# Altium PCB ChrisByrd-IoT_Product.PcbDoc (part 1 of 6)
Units mil, origin at the board's own origin, x right, y up, seen from the top; angles counter-clockwise.
Board outline 5314.96 x 4000 mil, 2 copper layers (Top Layer, Bottom Layer), stack 57 mil thick; 306 components, 230 nets, 1006 pads, 531 vias.
Unrouted connection lines stored in the file: 476.
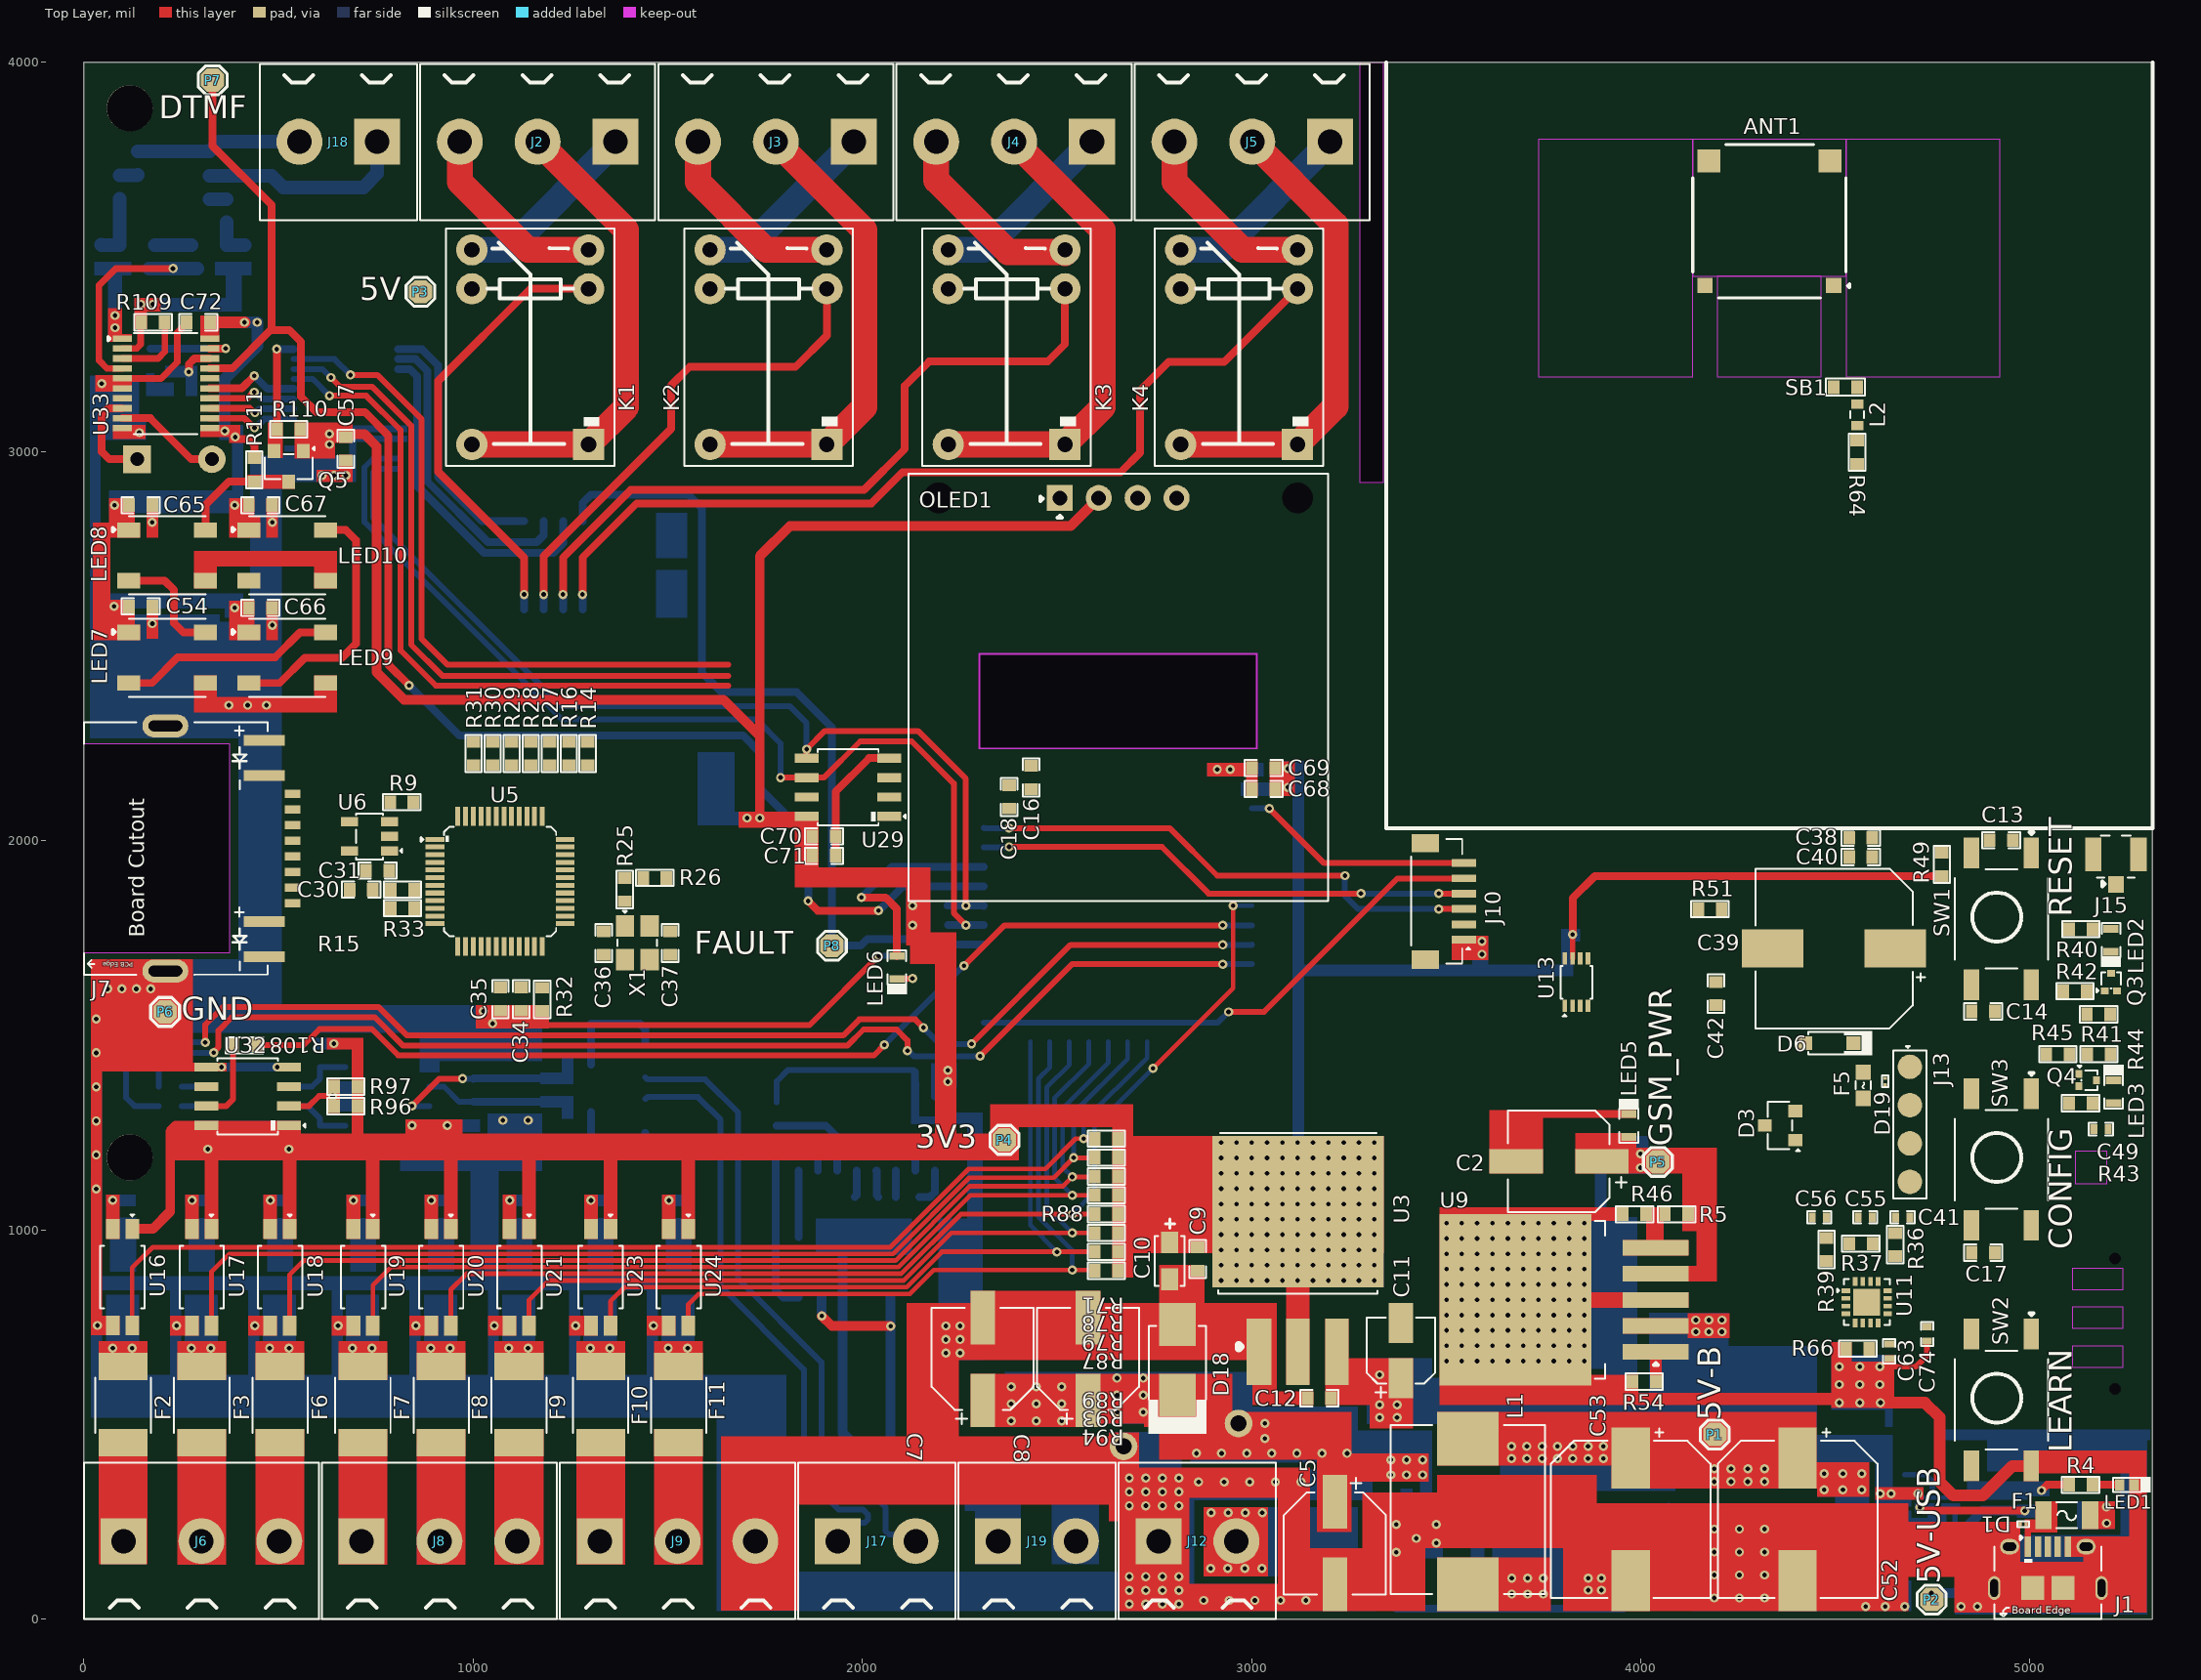
[diagram p0: Top Layer view]
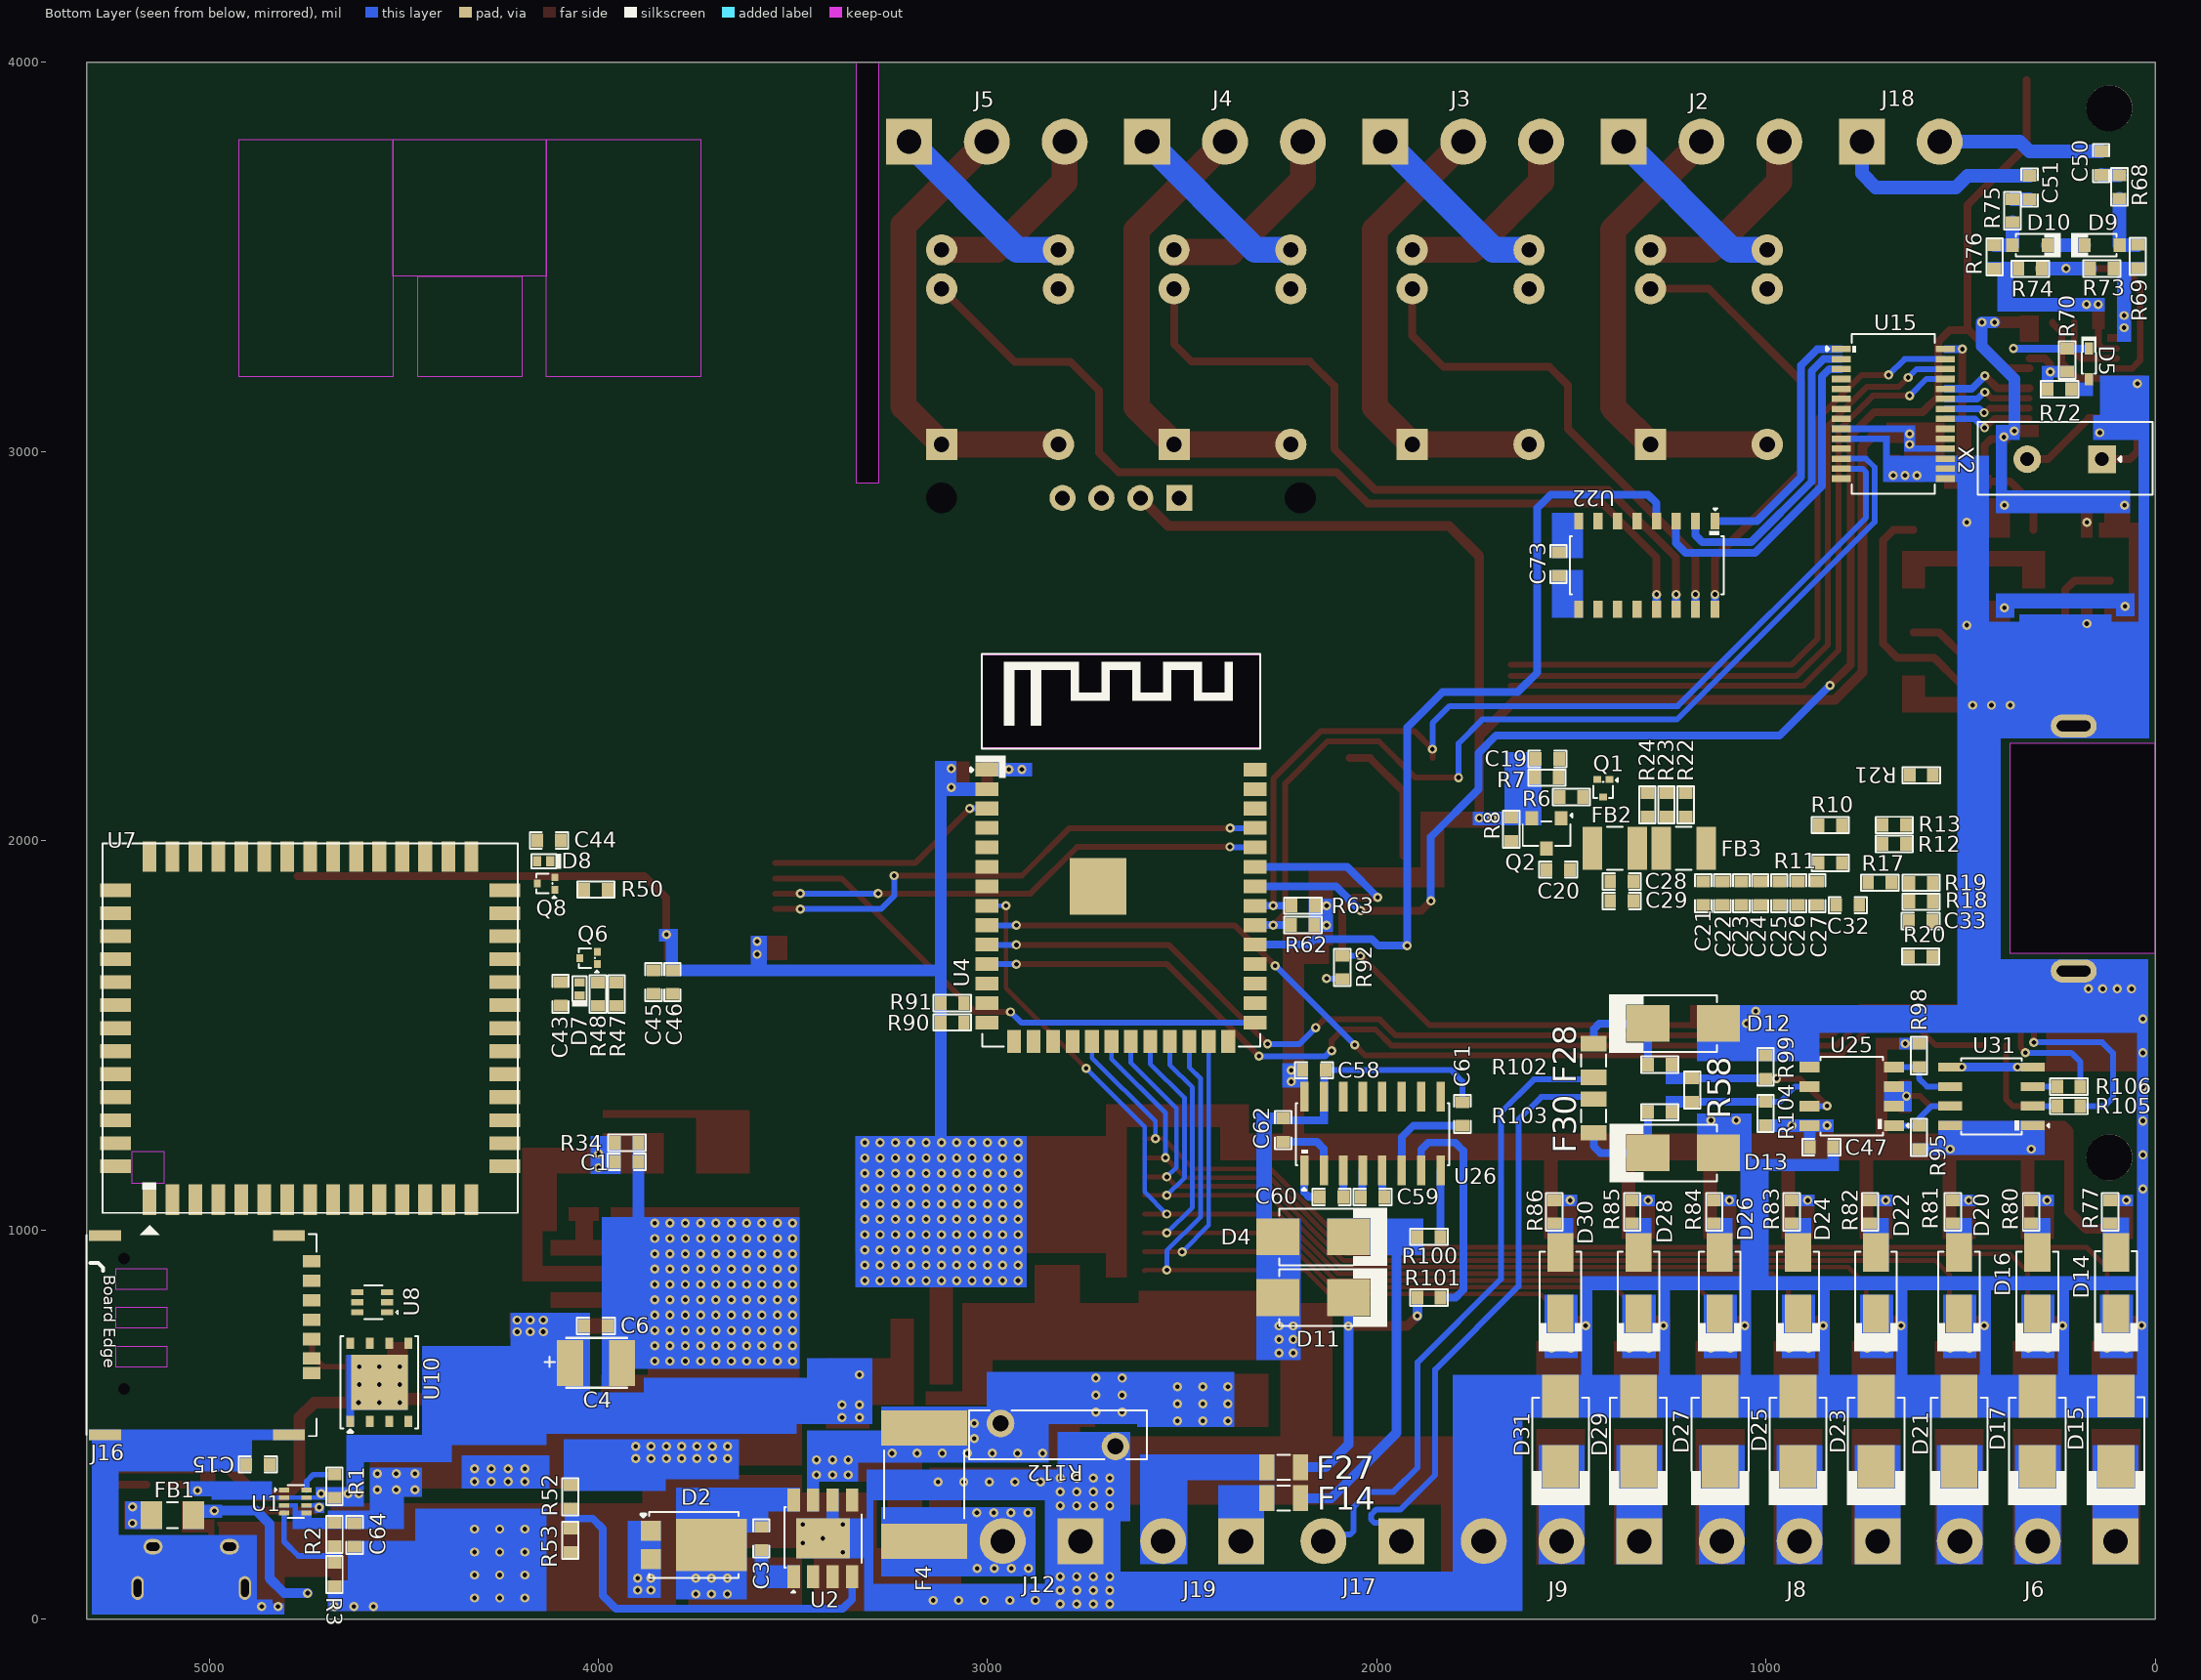
[diagram p1: Bottom Layer view, seen from below]

## Layer stack, top to bottom
Top Solder: solder mask 3, Solder Resist, Dk 3.5
Top Layer: signal copper 10
Dielectric 1: dielectric 37, FR-4, Dk 4.8
Bottom Layer: signal copper 10
Bottom Solder: solder mask 3, Solder Resist, Dk 3.5

## Board outline
0,0 5314.96,0 5314.96,4000 0,4000
cut-out: 2299.09,2236.31 3015.09,2236.31 3015.09,2480.01 2299.09,2480.01
cut-out: 0,1711 0,2249.05 374.01,2248.99 374.01,1711
cut-out: 3279.53,2919.85 3279.53,4000 3338.58,4000 3338.58,2919.85

## Design rules (kind name [scope] priority, off if disabled: settings)
Clearance [All] p1: gap=5 ignorepadtopadclearanceinfootprint=TRUE
ComponentClearance [All] p1: gap=0 collisioncheckmode=3 verticalgap=0 showdistances=FALSE
DiffPairsRouting DiffPairsRouting_USB [InDifferentialPairClass('GSM_USB_Lines')] p1: maxlimit=14 minlimit=14 mostfreqgap=14 toplayer_minwidth=15 toplayer_maxwidth=15 toplayer_prefwidth=15 bottomlayer_minwidth=15 bottomlayer_maxwidth=15 bottomlayer_prefwidth=15 impedanceprofiledriven=TRUE impedanceprofileid={E67A9529-945D-4E26-B9DB-1DDE1D698E6C} impedanceprofilevalue=90.000000 maxuncoupledlength=500
DiffPairsRouting DiffPairsRouting_RS485 [InDifferentialPairClass('RS485_LINES')] p2: maxlimit=30 minlimit=30 mostfreqgap=30 toplayer_minwidth=15 toplayer_maxwidth=15 toplayer_prefwidth=15 bottomlayer_minwidth=15 bottomlayer_maxwidth=15 bottomlayer_prefwidth=15 impedanceprofiledriven=TRUE impedanceprofileid={DA487A43-3C18-4068-BCE5-7E4DBD23F805} impedanceprofilevalue=120.000000 maxuncoupledlength=500
DiffPairsRouting DiffPairsRouting_Ethernet [InDifferentialPairClass('EtherCAT_A_Lines')] p3: maxlimit=20 minlimit=20 mostfreqgap=20 toplayer_minwidth=18 toplayer_maxwidth=18 toplayer_prefwidth=18 bottomlayer_minwidth=18 bottomlayer_maxwidth=18 bottomlayer_prefwidth=18 impedanceprofiledriven=TRUE impedanceprofileid={7F682D63-5A6A-4BE7-88C5-E323DC3F47E4} impedanceprofilevalue=100.000000 maxuncoupledlength=500
HoleToHoleClearance [All] p1: gap=5 allowstackedmicrovias=TRUE
MatchedLengths "Schematic Matched Net Lengths" [InDifferentialPairClass('EtherCAT_A_Lines')] p1: tolerance=20 checknetsindiffpair=TRUE checkdiffpairvsdiffpair=FALSE checkxsignals=FALSE checkothers=FALSE
MatchedLengths "Schematic Matched Net Lengths_2" [InDifferentialPairClass('GSM_USB_Lines')] p2: tolerance=20 checknetsindiffpair=TRUE checkdiffpairvsdiffpair=FALSE checkxsignals=FALSE checkothers=FALSE
MatchedLengths "Schematic Matched Net Lengths_1" [InDifferentialPairClass('RS485_LINES')] p3: tolerance=20 checknetsindiffpair=TRUE checkdiffpairvsdiffpair=FALSE checkxsignals=FALSE checkothers=FALSE
MaxMinImpedance "Schematic Impedance Constraint_1" [InNetClass('RS485')] p1: minimum=115.0 maximum=120.0
MaxMinImpedance "Schematic Impedance Constraint_2" [InNetClass('EtherCAT_A')] p2: minimum=85.00 maximum=95.00
MaxMinImpedance "Schematic Impedance Constraint" [InNetClass('GSM_USB')] p3: minimum=85.00 maximum=90.00
MinimumSolderMaskSliver [All] p1: minsoldermaskwidth=0
PolygonConnect [All] p1: connectstyle=Relief reliefconductorwidth=20 reliefentries=4 polygonreliefangle="45 Angle" airgapwidth=10
RoutingVias [All] p1: holewidth=11.81 width=23.62 viastyle="Through Hole" minholewidth=11.81 minwidth=23.62 maxholewidth=11.81 maxwidth=23.62
SilkToSilkClearance [All] p1: silktosilkclearance=6
SilkToSolderMaskClearance [IsPad] p1: minsilkscreentomaskgap=3 clearancetoexposedcopper=TRUE
SolderMaskExpansion [All] p1: expansion=4 istentingtop=FALSE
UnRoutedNet [All] p1: checkbadconnections=TRUE
Width [All] p1: maxlimit=66.93 minlimit=10 preferedwidth=20 minimp=50.000000 maximp=50.000000 favimp=50.000000
23 further rules are at their usual default settings.

## Classes and differential pairs
differential pair class RS485_LINES: RS485
net class RS485: RS485_N RS485_P
differential pair class GSM_USB_Lines: GSM_PROG.GSM_USB_D
differential pair class EtherCAT_A_Lines: RD TD
net class GSM_USB: GSM_PROG.GSM_USB_D_N GSM_PROG.GSM_USB_D_P
net class EtherCAT_A: RD_N RD_P TD_N TD_P
component class U_RS485_RS232_Sheet: C47 C58 C59 C60 C61 C62 D4 D11 D12 D13 F14 F27 F28 F30 R58 R95 R96 R97 R98 R99 R100 R101 R102 R103 R104 R105 R106 R108 U25 U26 U31 U32
component class U_Power_Sheet: C1 C2 C3 C4 C5 C6 C7 C8 C9 C10 C11 C12 C52 C53 C64 D2 L1 LED1 LED5 P1 P2 P3 P4 P5 P6 R1 R2 R3 R4 R5 R34 R46 R52 R53 R54 U1 U2 U3 U9
component class U_LEDs_Sheet: C54 C65 C66 C67 LED7 LED8 LED9 LED10 Q5 R110 R111
component class U_GSM_Sheet: ANT1 C38 C39 C40 C41 C42 C43 C44 C45 C46 C49 C55 C56 C63 C74 D6 D7 D8 J15 J16 L2 LED2 LED3 Q3 Q4 Q6 Q8 R36 R37 R39 R40 R41 R42 R43 R44 R45 R47 R48 R50 R51 R64 R66 SB1 U7 U8 U10 U11 U13
component class U_GPIOs_Expander_Relay_Sheet: C57 C73 D14 D15 D16 D17 D20 D21 D22 D23 D24 D25 D26 D27 D28 D29 D30 D31 F2 F3 F6 F7 F8 F9 F10 F11 K1 K2 K3 K4 R77 R80 R81 R82 R83 R84 R85 R86 U15 U16 U17 U18 U19 U20 U21 U22 U23 U24
component class U_Ethernet_Sheet: C19 C20 C21 C22 C23 C24 C25 C26 C27 C28 C29 C30 C31 C32 C33 C34 C35 C36 C37 FB2 FB3 J7 Q1 Q2 R6 R7 R8 R9 R10 R11 R12 R13 R14 R15 R16 R17 R18 R19 R20 R21 R22 R23 R24 R25 R26 R27 R28 R29 R30 R31 R32 R33 U5 U6 X1
component class U_DTMF_Decoder_Sheet: C50 C51 C72 D5 D9 D10 R68 R69 R70 R72 R73 R74 R75 R76 R109 U33 X2
component class U_Controller_Sheet: C13 C14 C15 C16 C17 C18 C68 C69 C70 C71 J10 LED6 OLED1 P7 P8 R49 R62 R63 R71 R78 R79 R87 R88 R89 R90 R91 R92 R93 R94 SW1 SW2 SW3 U4 U29
component class U_Connector_Sheet: D1 D3 D18 D19 F1 F4 F5 FB1 J1 J2 J3 J4 J5 J6 J8 J9 J12 J13 J17 J18 J19 R112
differential pair RS485: +RS485_P -RS485_N
differential pair TD: +TD_P -TD_N
differential pair RD: +RD_P -RD_N
differential pair GSM_PROG.GSM_USB_D: +GSM_PROG.GSM_USB_D_P -GSM_PROG.GSM_USB_D_N

## Components (designator, comment, footprint, x,y, rotation, side; value= is the part's Value field where it differs from the comment)
ANT1 "2118900-1" 2118900-1 4330.32,3586.61 r0 top
C1 "0.1uF" Cap-0603 3926.74,1174.47 r0 bottom
C2 "330uF" GVT1C331M0607 3790,1176 r180 top
C3 "10nF" Cap-0603 3581.26,206.55 r270 bottom
C4 "100uF" Case-B 4006,658 r180 bottom
C5 "68uF" RVT1H680M0607 3214,195 r270 top locked
C6 "1uF" Cap-0603 4006.07,753.11 r180 bottom
C7 "68uF" RVT1H680M0607 2309.1,668 r90 top
C8 "68uF" RVT1H680M0607 2580,668 r90 top
C9 "0.1uF" Cap-0603 2861.5,924.72 r90 top
C10 "47uF" Case-A 2789.49,920.35 r270 top
C11 "10uF" RVT1E100M0405_ 3383.55,689.89 r90 top
C12 "0.1uF" Cap-0603 3174.48,567.01 r0 top
C13 "0.1uF" Cap-0603 4926.38,2000.97 r180 top
C14 "1uF" Cap-0603 4880.16,1560.91 r0 top
C15 "0.1uF" Cap-0603 4875,396.97 r180 bottom
C16 "1uF" Cap-0603 2434,2162.61 r90 top
C17 "0.1uF" Cap-0603 4880.16,941.09 r180 top
C18 "1uF" Cap-0603 2377.24,2112.61 r90 top
C19 "22uF" Cap-0603 1562.07,2209.78 r0 bottom
C20 "22uF" Cap-0603 1534.03,1925.57 r0 bottom
C21 "0.1uF" Cap-0603 1161.26,1865 r90 bottom
C22 "0.1uF" Cap-0603 1112.45,1865 r90 bottom
C23 "0.1uF" Cap-0603 1063.65,1865 r90 bottom
C24 "0.1uF" Cap-0603 1014.84,1865 r90 bottom
C25 "0.1uF" Cap-0603 966.04,1865 r90 bottom
C26 "0.1uF" Cap-0603 917.23,1865 r90 bottom
C27 "10uF" Cap-0603 868.43,1865 r90 bottom
C28 "10uF" Cap-0603 1370.43,1895 r180 bottom
C29 "0.1uF" Cap-0603 1370.43,1845 r180 bottom
C30 "6.8nF" Cap-0603 712.72,1874 r0 top
C31 "6.8nF" Cap-0603 755,1923 r180 top
C32 "22nF" Cap-0603 790.42,1834.25 r180 bottom
C33 "10nF" Cap-0603 602.9,1793.54 r180 bottom
C34 "10nF" Cap-0603 1123.43,1593 r90 top
C35 "4.7uF" Cap-0603 1070.43,1593 r90 top
C36 "12pF" Cap-0603 1335.57,1737.13 r90 top
C37 "12pF" Cap-0603 1506.56,1737.13 r270 top
C38 "0.1uF" Cap-0603 4565.32,2007.24 r0 top
C39 "220uF" UCD-220uF-10mmDia 4496.32,1722.69 r180 top
C40 "1uF" Cap-0603 4565.32,1957.69 r180 top
C41 "22PF" Cap-0402 4672.71,1031.91 r180 top value=22pF
C42 "0.1uF" Cap-0603 4193,1607 r270 top
C43 "0.1uF" Cap-0603 4097,1606 r90 bottom
C44 "0.1uF" Cap-0603 4127,2000.58 r0 bottom
C45 "0.1uF" Cap-0603 3858.3,1636.23 r90 bottom
C46 "0.1uF" Cap-0603 3809.68,1636.24 r90 bottom
C47 "0.1uF" Cap-0603 858,1212 r0 bottom
C49 "33pF" Cap-0402 5182.3,1258.58 r180 top
C50 "0.1uF" Cap-0603 139,3741 r90 bottom
C51 "0.1uF" Cap-0603 323,3678.61 r90 bottom
C52 "220uF" UCD-220uF-10mmDia 4403,256 r270 top locked
C53 "220uF" UCD-220uF-10mmDia 3974,256 r270 top locked
C54 "0.1uF" Cap-0603 146.04,2601.82 r0 top
C55 "22PF" Cap-0402 4576.66,1031.91 r0 top value=22pF
C56 "22PF" Cap-0402 4458.8,1031.91 r0 top value=22pF
C57 "0.1uF" Cap-0603 673.32,3007.12 r270 top
C58 "0.1uF" Cap-0603 2161,1410 r0 bottom
C59 "0.1uF" Cap-0603 2011.06,1084.51 r180 bottom
C60 "0.1uF" Cap-0603 2116.06,1084.5 r180 bottom
C61 "0.1uF" Cap-0603 1780,1298 r90 bottom
C62 "0.1uF" Cap-0603 2240.81,1255.99 r90 bottom
C63 "100nF" cap-0402 4638.21,687.81 r90 top
C64 "0.1uF" Cap-0603 4625.96,215.94 r270 bottom
C65 "0.1uF" Cap-0603 145.86,2862.12 r0 top
C66 "0.1uF" Cap-0603 454.13,2598 r0 top
C67 "0.1uF" Cap-0603 454.13,2862.12 r0 top
C68 "0.1uF" Cap-0603 3031.01,2132.6 r180 top
C69 "0.1uF" Cap-0603 3031.01,2186.77 r180 top
C70 "0.1uF" Cap-0603 1902,2011 r0 top
C71 "10uF" Cap-0603 1902,1961 r0 top
C72 "0.1uF" Cap-0603 294.23,3331.92 r180 top
C73 "0.1uF" Cap-0603 1533.32,2710.69 r90 bottom
C74 "100nF" cap-0402 4735.66,732.49 r90 top
D1 "PESD5V0H1BSFYL" DSN0603-2 4982.17,243.49 r180 top
D2 "ST20100L" TO-277 3787,190 r270 bottom
D3 "ESD5302F-3/TR" Sot-23 4358,1268 r90 top
D4 "SMBJ26CA" SMB_ 2163.43,981.77 r180 bottom
D5 "1N4148WT" SOD-523F 170.63,3225.12 r90 bottom
D6 "MMSZ5231BT1G" SOD-123 4484.35,1479.41 r0 top
D7 "ESD5651N-2/TR" DFN1006-2L_ 4048,1619 r90 bottom
D8 "ESD5651N-2/TR" DFN1006-2L_ 4140.27,1946.99 r0 bottom
D9 "BZT52C5V6S" SOD-323 136.94,3530 r180 bottom
D10 "BZT52C5V6S" SOD-323 321.72,3530 r0 bottom
D11 "SMBJ26CA" SMB_ 2163.43,825.71 r180 bottom
D12 "SMBJ26CA" SMB_ 1213,1530 r0 bottom
D13 "SMBJ26CA" SMB_ 1212.69,1197.56 r0 bottom
D14 "SS36" SMA 101,863.3 r90 bottom
D15 "SMBJ36CA" SMB_ 101,482.3 r270 bottom
D16 "SS36" SMA 303,863 r90 bottom
D17 "SMBJ36CA" SMB_ 303,482 r270 bottom
D18 "SMBJ36CA" SMB_ 2809.5,666.03 r270 top
D19 "PESD5V0H1BSFYL" DSN0603-2 4627.94,1381.17 r270 top
D20 "SS36" SMA 504,863 r90 bottom
D21 "SMBJ36CA" SMB_ 504,481.97 r270 bottom
D22 "SS36" SMA 717.68,863.01 r90 bottom
D23 "SMBJ36CA" SMB_ 717,481.97 r270 bottom
D24 "SS36" SMA 918,863.01 r90 bottom
D25 "SMBJ36CA" SMB_ 918,481.97 r270 bottom
D26 "SS36" SMA 1119,863 r90 bottom
D27 "SMBJ36CA" SMB_ 1118,481.97 r270 bottom
D28 "SS36" SMA 1328,863 r90 bottom
D29 "SMBJ36CA" SMB_ 1328,481.97 r270 bottom
D30 "SS36" SMA 1528,863 r90 bottom
D31 "SMBJ36CA" SMB_ 1528,481.97 r270 bottom
F1 "1206L300SLTHYR" "Fuse 1206 (3216 Metric)" 5094.36,266.95 r0 top
F2 "BSMD1812-150-33V" Fuse-1812_ 101,551.3 r270 top
F3 "BSMD1812-150-33V" Fuse-1812_ 303,551 r270 top
F4 "SHV2920P500-30-AA" Fuse-2920 3163,345 r90 bottom locked
F5 "SMD0603-050" Fuse-0603 4571.66,1371.35 r270 top
F6 "BSMD1812-150-33V" Fuse-1812_ 504,551 r270 top
F7 "BSMD1812-150-33V" Fuse-1812_ 717,551 r270 top
F8 "BSMD1812-150-33V" Fuse-1812_ 918,551 r270 top
F9 "BSMD1812-150-33V" Fuse-1812_ 1118,551 r270 top
F10 "BSMD1812-150-33V" Fuse-1812_ 1328,551 r270 top
F11 "BSMD1812-150-33V" Fuse-1812_ 1528,551 r270 top
F14 "SMD0805P020TF" Fuse-0805 2239.28,310.27 r180 bottom
F27 "SMD0805P020TF" Fuse-0805 2239.28,389.82 r180 bottom
F28 "SMD0805P020TF" Fuse-0805 1443,1435 r270 bottom
F30 "SMD0805P020TF" Fuse-0805 1443,1292.65 r90 bottom
FB1 "100MHz" IND-1206 5094.36,266.95 r180 bottom
FB2 "FBMH3225HM601NT" IND-1210 1388.51,1980 r180 bottom
FB3 "FBMH3225HM601NT" IND-1210 1211.51,1980 r180 bottom
J1 "10118194-0001LF" 10118194-0001LF_ 5045.9,185.81 r0 top locked
J2 "DB128L-5.08-3P-BK-S" DB128L-5.08-3P-BK-S 1166,3796 r180 top locked
J3 "DB128L-5.08-3P-BK-S" DB128L-5.08-3P-BK-S 1778,3796 r180 top locked
J4 "DB128L-5.08-3P-BK-S" DB128L-5.08-3P-BK-S 2390,3796 r180 top locked
J5 "DB128L-5.08-3P-BK-S" DB128L-5.08-3P-BK-S 3002,3796 r180 top locked
J6 "DB128L-5.08-3P-BK-S" DB128L-5.08-3P-BK-S 302,200 r0 top locked
J7 "RC01812" RC01812 373,1980 r90 top locked
J8 "DB128L-5.08-3P-BK-S" DB128L-5.08-3P-BK-S 913.67,200 r0 top locked
J9 "DB128L-5.08-3P-BK-S" DB128L-5.08-3P-BK-S 1525.33,200 r0 top locked
J10 "Voltlink Target" "Voltlink Target" 3496,1844 r90 top
J12 "DB128L-5.08-2P-BK-S" DB128L-5.08-2P-BK-S 2861,200 r0 top locked
J13 "POGO Connector 4 Pin" "Pogo 4 Pin" 4691.3,1271.12 r270 top
J15 "U.FL-R-SMT-1(80)" U.FL-R-SMT-1(80)_ 5220.56,1925.9 r0 top
J16 "XKNANO-113" XKNANO-113 5002,729 r270 bottom
J17 "DB128L-5.08-2P-BK-S" DB128L-5.08-2P-BK-S 2037.28,200 r0 top locked
J18 "DB128L-5.08-2P-BK-S" DB128L-5.08-2P-BK-S 654,3796 r180 top locked
J19 "DB128L-5.08-2P-BK-S" DB128L-5.08-2P-BK-S 2449,200 r0 top locked
K1 "BS4-5S-C20" BS4-5S-C20 1147,3268 r90 top
K2 "BS4-5S-C20" BS4-5S-C20 1759,3268 r90 top
K3 "BS4-5S-C20" BS4-5S-C20 2371,3268 r90 top
K4 "BS4-5S-C20" BS4-5S-C20 2968,3268 r90 top
L1 "10uH" PSPMAA1040-100M-ANP 3556,276 r90 top
L2 "27nH" "IND-0603 (1608 Metric)" 4556,3094.44 r90 top
LED1 "Green" LED-0402 5248.83,344.69 r0 top
LED2 "Yellow" LED-0603 5208.13,1744.11 r270 top
LED3 "RED" LED-0603 5214.48,1354.99 r90 top
LED5 "RED" LED-0603 3969.13,1268 r90 top
LED6 "Blue" LED-0603 2089,1674 r270 top
LED7 "WS2812B-B/W" WS2812B-B/W 214.29,2470 r0 top
LED8 "WS2812B-B/W" WS2812B-B/W 214.29,2733.12 r0 top
LED9 "WS2812B-B/W" WS2812B-B/W 522.65,2470 r0 top
LED10 "WS2812B-B/W" WS2812B-B/W 522.65,2733.12 r0 top
OLED1 "OLED 0.96\" inch i2C" "OLED 0.96\" INCH I2C" 2657.48,2880.47 r0 top locked
P1 "TEST POINT" Test-point 4190.36,474.09 r0 top
P2 "TEST POINT" Test-point 4747.37,49.82 r0 top
P3 "TEST POINT" Test-point 865,3410.17 r0 top
P4 "TEST POINT" Test-point 2365,1231 r0 top
P5 "TEST POINT" Test-point 4044,1174.47 r0 top
P6 "TEST POINT" Test-point 209,1560 r270 top
P7 "TEST POINT" Test-point 330.82,3954.02 r0 top
P8 "TEST POINT" Test-point 1922,1730 r0 top
Q1 "MMBT3904M" SOT-723 1418.32,2134.62 r0 bottom
Q2 "FDN306P" SOT-23 1564.03,2018.63 r0 bottom
Q3 "MMBT3904M" SOT-723 5208.13,1635.96 r0 top
Q4 "MMBT3904M" SOT-723 5148.33,1384.48 r270 top
Q5 "BSS138" Sot-23 526.46,2961.41 r180 top
Q6 "MMBT3904M" SOT-723 4024.68,1698.31 r90 bottom
Q8 "MMBT3904M" SOT-723 4134.48,1889.75 r90 bottom
R1 "10K" Res-0603 4677.9,341 r270 bottom
R2 "1K" Res-0603 4677.9,216.94 r90 bottom
R3 "1K" Res-0603 4677.9,114 r90 bottom
R4 "1K" Res-0603 5130.26,344.7 r0 top
R5 "100K" Res-0603 4092.02,1040 r180 top
R6 "1K" Res-0603 1500.32,2111.98 r180 bottom
R7 "10K" Res-0603 1563.07,2161.78 r0 bottom
R8 "0R" Res-0603 1654.43,2029 r90 bottom
R9 "49.9R" Res-0603 816.88,2098.56 r0 top
R10 "49.9R" Res-0603 834.88,2039.66 r0 bottom
R11 "10R" Res-0603 834.88,1942.42 r0 bottom
R12 "33R" Res-0603 670.9,1991.67 r180 bottom
R13 "33R" Res-0603 670.9,2040.23 r180 bottom
R14 "10K" Res-0603 1294.43,2224 r90 top
R15 "33R" Res-0603 819,1874 r0 top
R16 "10K" Res-0603 1246.09,2224 r90 top
R17 "33R" Res-0603 707.8,1892.13 r0 bottom
R18 "49.9R" Res-0603 601.9,1843.02 r0 bottom
R19 "49.9R" Res-0603 601.9,1891.51 r0 bottom
R20 "330R" Res-0603 602.9,1702.05 r0 bottom
R21 "330R" Res-0603 601,2168 r0 bottom
R22 "10K" Res-0603 1206.42,2092 r270 bottom
R23 "10K" Res-0603 1255.99,2092 r270 bottom
R24 "10K" Res-0603 1304.74,2092 r270 bottom
R25 "1M" Res-0603 1389.9,1874.13 r90 top
R26 "0R" Res-0603 1466.9,1904.13 r180 top
R27 "10K" Res-0603 1197.16,2224 r270 top
R28 "10K" Res-0603 1148.19,2224 r270 top
R29 "10K" Res-0603 1099.22,2224 r270 top
R30 "10K" Res-0603 1050.25,2224 r270 top
R31 "10K" Res-0603 1001.28,2224 r270 top
R32 "10K" Res-0603 1177.69,1592 r90 top
R33 "12.4K" Res-0603 819,1826.3 r0 top
R34 "470R" Res-0603 3926.74,1223.44 r0 bottom
R36 "22R" Res-0603 4654.02,961.91 r90 top
R37 "0R" Res-0603 4565.5,964.41 r180 top
R39 "22R" Res-0603 4477.24,949.41 r90 top
R40 "180R" Res-0603 5130.81,1772.36 r0 top
R41 "4.7K" Res-0603 5176.32,1553.35 r180 top
R42 "47K" Res-0603 5115.81,1612.91 r0 top
R43 "180R" Res-0603 5130.26,1325.45 r0 top
R44 "4.7K" Res-0603 5177.15,1451.06 r180 top
R45 "47K" Res-0603 5071.64,1451.12 r0 top
R46 "47K" Res-0603 3983.99,1040 r0 top
R47 "4.7K" Res-0603 3953.24,1605.57 r90 bottom
R48 "47K" Res-0603 4001.06,1605.57 r90 bottom
R49 "10K" Res-0603 4773.32,1938.69 r270 top
R50 "4.7K" Res-0603 4006,1874 r0 bottom
R51 "47K" Res-0603 4177.6,1823.76 r180 top
R52 "10K" Res-0603 4072,314 r90 bottom
R53 "3.24K" Res-0603 4072,201.8 r90 bottom
R54 "10K" Res-0603 4009,609.96 r0 top
R58 "120R" Res-0603 1189.89,1359.09 r270 bottom
R62 "4.7K" Res-0603 2190,1783 r180 bottom
R63 "4.7K" Res-0603 2189.49,1832.99 r180 bottom
R64 "10R" Res-0603 4556,2998 r270 top
R66 "10K" Res-0603 4557.66,694.46 r180 top
R68 "56K" Res-0603 92,3680 r270 bottom
R69 "56K" Res-0603 44.98,3500.99 r270 bottom
R70 "330K" Res-0603 226.23,3234.52 r90 bottom value=330kR
R71 "10K" Res-0603 2627,1234 r180 top
R72 "100K" Res-0603 246.08,3159.82 r180 bottom
R73 "47K" Res-0603 137.41,3470 r0 bottom
R74 "68K" Res-0603 321.25,3469.49 r180 bottom
R75 "56K" Res-0603 367,3618.61 r270 bottom
R76 "56K" Res-0603 413,3500 r270 bottom
R77 "2.2K" Res-0603 115.94,1046 r270 bottom
R78 "10K" Res-0603 2627.01,1185.57 r180 top
R79 "10K" Res-0603 2627.01,1137.14 r180 top
R80 "2.2K" Res-0603 319,1046 r270 bottom
R81 "2.2K" Res-0603 520,1046 r270 bottom
R82 "2.2K" Res-0603 733,1046 r270 bottom
R83 "2.2K" Res-0603 934,1046 r270 bottom
R84 "2.2K" Res-0603 1133.14,1046 r270 bottom
R85 "2.2K" Res-0603 1344,1046 r270 bottom
R86 "2.2K" Res-0603 1544,1046 r270 bottom
R87 "10K" Res-0603 2627.01,1088.71 r180 top
R88 "10K" Res-0603 2627.02,1040.29 r180 top
R89 "10K" Res-0603 2627,991.86 r180 top
R90 "4.7K" Res-0603 3090.62,1532.61 r0 bottom
R91 "4.7K" Res-0603 3090.62,1582.61 r0 bottom
R92 "1K" Res-0603 2089,1674 r270 bottom
R93 "10K" Res-0603 2627,943.43 r180 top
R94 "10K" Res-0603 2627,895 r180 top
R95 "4.7K" Res-0603 607.19,1237.25 r90 bottom
R96 "4.7K" Res-0603 673.12,1317.89 r180 top
R97 "4.7K" Res-0603 673.12,1367.89 r180 top
R98 "4.7K" Res-0603 607.19,1447.87 r270 bottom
R99 "4.7K" Res-0603 1001.28,1418.51 r270 bottom
R100 "22R" Res-0603 1866,981.77 r180 bottom
R101 "22R" Res-0603 1866,825.71 r180 bottom
R102 "22R" Res-0603 1273.09,1424.63 r0 bottom
R103 "22R" Res-0603 1273.09,1302.24 r0 bottom
R104 "4.7K" Res-0603 1001.28,1299.15 r270 bottom
R105 "1K" Res-0603 222,1318 r180 bottom
R106 "1K" Res-0603 222,1368 r180 bottom
R108 "1K" Res-0603 413,1474 r0 top
R109 "150K" Res-0603 178,3332 r0 top
R110 "10K" Res-0603 526.46,3057.28 r180 top
R111 "10K" Res-0603 438,2953 r270 top
R112 "B72210S0300K101" B72210S0300K101 2819,473 r180 bottom locked value=2.75nF
SB1 "Solder Bridge 0603" "Solder Bridge" 4526,3165 r180 top
SW1 "K2-6639SP-C4SC-04" K2-6639SP-C4SC-04 4926.38,1798.8 r270 top locked
SW2 "K2-6639SP-C4SC-04" K2-6639SP-C4SC-04 4926.38,562.58 r270 top locked
SW3 "K2-6639SP-C4SC-04" K2-6639SP-C4SC-04 4926.38,1180.69 r270 top locked
U1 "TPS2116DRLR" SOT-583 4778.32,301.69 r180 bottom
U2 "TPS5450DDAR" 8-SO-EP_ 3423,207 r90 bottom
U3 "LM1084S-3.3/TR" TO263-3_ 3119.47,866.65 r0 top
U4 "ESP32-S3-WROOM-1-N8R2" "41-SMD Module" 2657,1833 r180 bottom
U5 "W5500" "48-LQFP (7x7)_" 1069.43,1895 r0 top locked
U6 "SP0504BAHTG" SOT-23-5 734,2011 r180 top value=30pF
U7 "SIM7500E" SIM7500E 4740,1518 r90 bottom locked
U8 "SMF05CT1G-ES" SOT-363 4580.5,813.99 r0 bottom
U9 "MIC29302WU-TR" "TO-263-5 (D2PAK)" 3858.3,820.04 r90 top
U10 "SIM-ST-MFF2" "QNF8 (6 X 5MM)" 4562.66,608.04 r90 bottom
U11 "FSA2567MPX" "16-MLP (3X3)" 4580.5,813.99 r0 top
U13 "TXB0102DCUT" VSSOP-8(2x2.3x0.5) 3834.68,1636.23 r90 top
U15 "MCP23017T-E/SS" SSOP-28-208mil 673.32,3096.69 r180 bottom
U16 "PS2801C-1-F3-A" SOP-4_1.27 99.4,878.28 r270 top
U17 "PS2801C-1-F3-A" SOP-4_1.27 303,877.98 r270 top
U18 "PS2801C-1-F3-A" SOP-4_1.27 504,877.98 r270 top
U19 "PS2801C-1-F3-A" SOP-4_1.27 717.68,877.98 r270 top
U20 "PS2801C-1-F3-A" SOP-4_1.27 918,877.98 r270 top
U21 "PS2801C-1-F3-A" SOP-4_1.27 1119,877.98 r270 top
U22 "ULN2003A" SOP-16_150mil 1306.32,2707.69 r270 bottom
U23 "PS2801C-1-F3-A" SOP-4_1.27 1328,877.98 r270 top
U24 "PS2801C-1-F3-A" SOP-4_1.27 1528,877.98 r270 top
U25 "SP3485EIM/TR" SOP-8 780,1343 r0 bottom
U26 "MAX3232IDR" SOIC-16 2011.06,1247.32 r90 bottom
U29 "ATECC608B-SSHDA-B" SOIC-8 1963.3,2137 r180 top
U31 "ADUM1201ARZ-RL7" SOIC-8 420.93,1343 r0 bottom
U32 "ADUM1200ARZ-RL7" SOIC-8 420.94,1343 r180 top
U33 "MT8870DN1" SSOP-20-5.2mm 211.23,3174.92 r0 top
X1 "25MHZ" NX3225GA-25MHZ-STD-CRG-2 1421.9,1737.13 r270 top
X2 "3.579545MHz" X49SD3579545MSD2SC-1 233,2980 r0 bottom

## Footprints (in the part's own frame and the unit in brackets; to place one, negate y for a bottom-side part, rotate by r counter-clockwise, add the part's x,y. Pads: shape width x height; smd on the part's side, far side on the other; paste and mask are expansions set on the pad)
8-SO-EP_ [mm]
  rect 1.505x0.802 smd: 1(-2.497,1.905) 2(-2.497,0.635) 3(-2.497,-0.635) 4(-2.497,-1.905) 5(2.498,-1.905) 6(2.498,-0.635) 7(2.498,0.635) 8(2.498,1.905)
  rect 2.613x3.502 smd: 9(0,0)
  silkscreen extent -3.53,-2.51 2.03,2.51, body extent -3,-2.45 3,2.45, height 1.7
"16-MLP (3X3)" [mm]
  rect 0.57x0.3 smd: 1(-1.365,0.75) 2(-1.365,0.25) 3(-1.365,-0.25) 4(-1.365,-0.75) 9(1.365,-0.75) 10(1.365,-0.25) 11(1.365,0.25) 12(1.365,0.75)
  rect 0.3x0.57 smd: 5(-0.75,-1.365) 6(-0.25,-1.365) 7(0.25,-1.365) 8(0.75,-1.365) 13(0.75,1.365) 14(0.25,1.365) 15(-0.25,1.365) 16(-0.75,1.365)
  rect 1.75x1.75 smd: 17(0,0)
  silkscreen extent -1.93,-1.5 1.5,1.5, body extent -1.5,-1.5 1.5,1.5, height 0.84
"41-SMD Module" [mm]
  rect 1.5x0.9 smd: 1(-8.75,8.88) 2(-8.75,7.61) 3(-8.75,6.34) 4(-8.75,5.07) 5(-8.75,3.8) 6(-8.75,2.53) 7(-8.75,1.26) 8(-8.75,-0.01) 9(-8.75,-1.28) 10(-8.75,-2.55) 11(-8.75,-3.82) 12(-8.75,-5.09) 13(-8.75,-6.36) 14(-8.75,-7.63) 27(8.75,-7.63) 28(8.75,-6.36) 29(8.75,-5.09) 30(8.75,-3.82) 31(8.75,-2.55) 32(8.75,-1.28) 33(8.75,-0.01) 34(8.75,1.26) 35(8.75,2.53) 36(8.75,3.8) 37(8.75,5.07) 38(8.75,6.34) 39(8.75,7.61) 40(8.75,8.88)
  rect 0.9x1.5 smd: 15(-6.98,-8.88) 16(-5.71,-8.88) 17(-4.44,-8.88) 18(-3.17,-8.88) 19(-1.9,-8.88) 20(-0.63,-8.88) 21(0.64,-8.88) 22(1.91,-8.88) 23(3.18,-8.88) 24(4.45,-8.88) 25(5.72,-8.88) 26(6.99,-8.88)
  rect 3.7x3.7 smd: 41(-1.5,1.26)
  Keep-Out Layer region: -9.043,16.38 9.042,16.38 9.042,10.284 -9.043,10.284
  silkscreen extent -9.8,-9.2 9.09,16.43, body extent -9.01,-9.14 9.01,16.37, height 3.16
"48-LQFP (7x7)_" [mm]
  rect 1.22x0.32 smd: 1(-4.25,2.75) 2(-4.25,2.25) 3(-4.25,1.75) 4(-4.25,1.25) 5(-4.25,0.75) 6(-4.25,0.25) 7(-4.25,-0.25) 8(-4.25,-0.75) 9(-4.25,-1.25) 10(-4.25,-1.75) 11(-4.25,-2.25) 12(-4.25,-2.75) 25(4.25,-2.75) 26(4.25,-2.25) 27(4.25,-1.75) 28(4.25,-1.25) 29(4.25,-0.75) 30(4.25,-0.25) 31(4.25,0.25) 32(4.25,0.75) 33(4.25,1.25) 34(4.25,1.75) 35(4.25,2.25) 36(4.25,2.75)
  rect 0.32x1.22 smd: 13(-2.75,-4.25) 14(-2.25,-4.25) 15(-1.75,-4.25) 16(-1.25,-4.25) 17(-0.75,-4.25) 18(-0.25,-4.25) 19(0.25,-4.25) 20(0.75,-4.25) 21(1.25,-4.25) 22(1.75,-4.25) 23(2.25,-4.25) 24(2.75,-4.25) 37(2.75,4.25) 38(2.25,4.25) 39(1.75,4.25) 40(1.25,4.25) 41(0.75,4.25) 42(0.25,4.25) 43(-0.25,4.25) 44(-0.75,4.25) 45(-1.25,4.25) 46(-1.75,4.25) 47(-2.25,4.25) 48(-2.75,4.25)
  silkscreen extent -5.16,-3.58 3.66,3.58, body extent -4.51,-4.51 4.49,4.49, height 1.43
2118900-1 [mm]
  rect 1x1 smd: 1(4.2,-4.075) 2(-4.2,-4.075)
  rect 1.5x1.5 smd: 3(-3.95,4.075) 4(3.95,4.075)
  Keep-Out Layer region: 5,-10.027 15.062,-10.027 15.062,5.455 5,5.455
  Keep-Out Layer region: -5,-3.454 5,-3.454 5,5.455 -5,5.455
  Keep-Out Layer region: -5,5.455 -15.062,5.455 -15.062,-10.027 -5,-10.027
  Keep-Out Layer region: -3.4,-10.033 3.4,-10.033 3.4,-3.454 -3.4,-3.454
  silkscreen extent -5,-4.87 5.23,5.13, body extent -5,-4.87 5,5.13, height 1.01
10118194-0001LF_ [mm]
  rect 0.42x1.35 smd: 1(-1.3,0) 2(-0.65,0) 3(0,0) 4(0.65,0) 5(1.3,0)
  oval 1.25x1 hole 0.55 slot 0.85 at 0 deg: MH1(-2.5,0) MH2(2.5,0)
  oval 0.8x1.55 hole 0.5 slot 1.15 at 90 deg: MH3(-3.5,-2.7) MH4(3.5,-2.7)
  rect 1.5x1.55 smd: MP1(-1,-2.7) MP2(1,-2.7)
  Top Layer region: 193 vertices and 0 holes, not listed, extent -4,-3.475 -2.3,-1.92
  Top Layer region: 193 vertices and 0 holes, not listed, extent 2.3,-3.48 4,-1.925
  silkscreen extent -3.51,-4.72 3.51,0.71, body extent -4.02,-5.34 4.03,0.19, height 2.69
B72210S0300K101 [mm]
  round 1.8 hole 1.05: 1(-3.75,0.75) 2(3.75,-0.75)
  silkscreen extent -5.79,-1.6 5.79,1.6, body extent -5.75,-1.55 5.75,1.55, height 13.75
BS4-5S-C20 [mm]
  rect 2.04x2.04 hole 1: 1(-6.35,-3.81)
  round 2.04 hole 1: 2(3.81,-3.81) 3(6.35,-3.81) 4(6.35,3.81) 5(3.81,3.81) 6(-6.35,3.81)
  silkscreen extent -7.75,-5.5 7.75,5.5, body extent -7.75,-5.5 7.75,5.5, height 12.5
Cap-0402 [mil]
  rect 18x25 smd mask+2.36: 1(-18.5,0) 2(18.5,0)
  silkscreen extent -31,-16 31,16, body extent -20,-10 20,10, height 19
cap-0402 [mil]
  rect 18x25 smd mask+2.36: 1(-18.5,0) 2(18.5,0)
  silkscreen extent -31,-16 31,16, body extent -20,-10 20,10, height 19
Cap-0603 [mil]
  rect 30x35 smd mask+2.36: 1(-30,0) 2(30,0)
  silkscreen extent -49,-21 49,21, body extent -32,-16 31,16, height 34
Case-A [mm]
  rect 1.42x1.13 smd: 1(-1.2,0) 2(1.2,0)
  silkscreen extent -2.72,-0.97 1.63,0.97, body extent -1.6,-0.9 1.6,0.9, height 1.8
Case-B [mm]
  rect 1.7x3 smd paste+0: 1(-1.7,0) 2(1.7,0)
  silkscreen extent -3.35,-1.63 2.03,1.63, body extent -1.85,-1.5 1.85,1.5, height 2.16
DB128L-5.08-2P-BK-S [mm]
  rect 3x3 hole 1.6: 1(-2.54,0)
  round 3 hole 1.6: 2(2.54,0)
  silkscreen extent -5.13,-5.08 5.13,5.13, body extent -5.08,-5.03 5.13,5.07, height 10.3
DB128L-5.08-3P-BK-S [mm]
  rect 3x3 hole 1.6: 1(-5.08,0)
  round 3 hole 1.6: 2(0,0) 3(5.08,0)
  silkscreen extent -7.67,-5.08 7.67,5.13, body extent -7.59,-5.03 7.65,5.07, height 10.3
DFN1006-2L_ [mm]
  rect 0.55x0.66 smd: 1(-0.425,0) 2(0.425,0)
  silkscreen extent -1.14,-0.51 0.81,0.51, body extent -0.5,-0.3 0.5,0.3, height 0.47
DSN0603-2 [mm]
  rect 0.2x0.24 smd mask+0.055: 1(-0.2,0) 2(0.2,0)
  silkscreen extent -0.38,-0.2 0.38,0.2, body extent -0.3,-0.15 0.3,0.15, height 0.32
"Fuse 1206 (3216 Metric)" [mm] "0.126\" L x 0.062\" W x 0.026\" H (3.20mm x 1.58mm x 0.65mm)"
  rect 1.06x1.82 smd: 1(-1.528,0) 2(1.528,0)
  silkscreen extent -0.68,-0.85 0.68,0.85, body extent -1.6,-0.79 1.6,0.79, height 0.85
Fuse-0603 [mm]
  rect 1x1 smd: 1(-0.85,0) 2(0.85,0)
  silkscreen extent -0.25,-0.48 0.25,0.48, body extent -0.77,-0.42 0.78,0.43, height 0.45
Fuse-0805 [mm]
  rect 1x1.7 smd: 1(-1.1,0) 2(1.1,0)
  silkscreen extent -0.41,-0.81 0.41,0.81, body extent -1.1,-0.75 1.1,0.75, height 1.24
Fuse-1812_ [mm]
  rect 1.78x3.2 smd: 1(-2.49,0) 2(2.49,0)
  silkscreen extent -1.75,-1.8 1.85,1.8, body extent -2.36,-1.74 2.37,1.74, height 1.03
Fuse-2920 [mm]
  rect 2.3x5.6 smd: 1(-3.7,0) 2(3.7,0)
  silkscreen extent -2.18,-2.62 2.24,2.62, body extent -3.68,-2.56 3.68,2.56, height 0.9
GVT1C331M0607 [mm]
  rect 3.5x1.6 smd: 1(-2.8,0) 2(2.8,0)
  silkscreen extent -4.42,-3.33 3.35,3.33, body extent -3.65,-3.3 3.65,3.3, height 7.7
"IND-0603 (1608 Metric)" [mm] "0.063\" L x 0.032\" W (1.60mm x 0.80mm)"
  rect 0.6x0.8 smd: 1(-0.7,0) 2(0.7,0)
  silkscreen extent -0.2,-0.46 0.23,0.46, body extent -0.8,-0.4 0.8,0.4, height 0.78
IND-1206 [mm]
  rect 1.4x1.82 smd: 1(-1.36,0) 2(1.36,0)
  silkscreen extent -0.34,-0.85 0.34,0.85, body extent -1.6,-0.8 1.6,0.8, height 1.3
IND-1210 [mm]
  rect 1.27x2.81 smd: 1(-1.471,0) 2(1.471,0)
  silkscreen extent -0.52,-1.4 0.52,1.4, body extent -1.6,-1.4 1.6,1.4, height 2.5
K2-6639SP-C4SC-04 [mm]
  rect 2x1 smd: 1(-4.3,1.95) 2(4.3,1.95) 3(-4.3,-1.95) 4(4.3,-1.95)
  silkscreen extent -5.66,-3.05 3.23,3.05, body extent -4.5,-3 4.5,3, height 5
LED-0402 [mm]
  rect 0.62x0.72 smd: 1(-0.475,0) 2(0.475,0)
  silkscreen extent -0.89,-0.51 1.55,0.51, body extent -0.5,-0.25 0.51,0.25, height 0.45
LED-0603 [mm]
  rect 0.5x1 smd: 1(-0.75,0) 2(0.75,0)
  silkscreen extent -1.12,-0.66 1.75,0.66, body extent -0.82,-0.37 0.82,0.36, height 0.68
NX3225GA-25MHZ-STD-CRG-2 [mm]
  rect 1.4x1.2 smd: 1(-1.1,-0.8) 2(1.1,-0.8) 3(1.1,0.8) 4(-1.1,0.8)
  silkscreen extent -2.09,-1.3 0.2,1.3, body extent -1.6,-1.26 1.6,1.24, height 0.8
"OLED 0.96\" INCH I2C" [mm]
  rect 1.7x1.7 hole 0.95: 1(-3.81,0)
  round 1.7 hole 0.95: 2(-1.27,0) 3(1.27,0) 4(3.81,0)
  round 0 hole 2.02 unplated: 15(-11.7,0) 15(11.7,0)
  silkscreen extent -13.69,-26.31 13.69,1.57, body extent -13.65,-26.28 13.65,1.52, height 14.81
"Pogo 4 Pin" [mm]
  round 1.6 smd: 1(-3.75,0) 2(-1.25,0) 3(1.25,0) 4(3.75,0)
  silkscreen extent -5.11,-1.09 4.83,1.09
PSPMAA1040-100M-ANP [mm]
  rect 3.5x4 smd: 1(-4.75,0) 2(4.75,0)
  silkscreen extent -5.38,-5.03 5.64,5.03, body extent -5.57,-5.03 5.83,4.97, height 4
"QNF8 (6 X 5MM)" [mm]
  rect 0.71x0.51 smd: 1(-2.55,1.905) 2(-2.55,0.635) 3(-2.55,-0.635) 4(-2.55,-1.905) 5(2.55,-1.905) 6(2.55,-0.635) 7(2.55,0.635) 8(2.55,1.905)
  rect 3.6x3.7 smd: 9(0,0)
  silkscreen extent -3.25,-2.53 3.03,2.53, body extent -3,-2.5 3,2.5, height 0.82
RC01812 [mm]
  rect 0.55x1 smd: 1(-3.57,-4.15) 2(-2.55,-4.15) 3(-1.53,-4.15) 4(-0.51,-4.15) 5(0.51,-4.15) 6(1.53,-4.15) 7(2.55,-4.15) 8(3.57,-4.15)
  rect 0.7x2.7 smd: 9(-7.06,-2.3) 10(-4.77,-2.3) 11(4.77,-2.3) 12(7.06,-2.3)
  oval 1.5x3 hole 0.7 slot 2.2 at 90 deg: "Shield 1"(-8,4.15) "Shield 2"(8,4.15)
  silkscreen extent -8.24,-2.54 8.24,9.47, body extent -8.2,-4.72 8.23,12.08, height 6.9
Res-0603 [mil]
  rect 30x35 smd: 1(-30,0) 2(30,0)
  silkscreen extent -48,-21 48,21, body extent -31,-17 31,17, height 18
RVT1E100M0405_ [mm] "10uF 25V 5.4mm SMD"
  rect 2.6x1.6 smd: 1(-1.8,0) 2(1.8,0)
  silkscreen extent -3.1,-2.22 2.16,2.22, body extent -2.65,-2.15 2.65,2.15, height 5.7
RVT1H680M0607 [mm]
  rect 3.5x1.6 smd: 1(-2.7,0) 2(2.7,0)
  silkscreen extent -4.25,-3.33 3.35,3.33, body extent -3.3,-3.3 3.3,3.3, height 7.94
SIM7500E [mm]
  rect 2x0.9 smd: 1(-11.2,10.5) 2(-11.2,9) 3(-11.2,7.5) 4(-11.2,6) 5(-11.2,4.5) 6(-11.2,3) 7(-11.2,1.5) 8(-11.2,0) 9(-11.2,-1.5) 10(-11.2,-3) 11(-11.2,-4.5) 12(-11.2,-6) 13(-11.2,-7.5) 14(-11.2,-9) 15(-11.2,-10.5) 29(11.2,-10.5) 30(11.2,-9) 31(11.2,-7.5) 32(11.2,-6) 33(11.2,-4.5) 34(11.2,-3) 35(11.2,-1.5) 36(11.2,0) 37(11.2,1.5) 38(11.2,3) 39(11.2,4.5) 40(11.2,6) 41(11.2,7.5) 42(11.2,9) 43(11.2,10.5)
  rect 0.9x2 smd: 16(-9,-12.7) 17(-7.5,-12.7) 18(-6,-12.7) 19(-4.5,-12.7) 20(-3,-12.7) 21(-1.5,-12.7) 22(0,-12.7) 23(1.5,-12.7) 24(3,-12.7) 25(4.5,-12.7) 26(6,-12.7) 27(7.5,-12.7) 28(9,-12.7) 44(9,12.7) 45(7.5,12.7) 46(6,12.7) 47(4.5,12.7) 48(3,12.7) 49(1.5,12.7) 50(0,12.7) 51(-1.5,12.7) 52(-3,12.7) 53(-4.5,12.7) 54(-6,12.7) 55(-7.5,12.7) 56(-9,12.7)
  Keep-Out Layer region: -10.15,11.64 -8.05,11.64 -8.05,9.54 -10.15,9.54
  silkscreen extent -13.5,-13.54 12.05,13.56, body extent -12.01,-13.5 11.99,13.5, height 2.95
SMA [mm]
  rect 2.5x1.7 smd: 1(-2,0) 2(2,0)
  silkscreen extent -4.45,-1.42 2.06,1.42, body extent -2.6,-1.3 2.6,1.3, height 2.4
SMB_ [mm]
  rect 2.8x2.4 smd: 1(-2.3,0) 2(2.3,0)
  silkscreen extent -2.21,-1.9 4.83,1.91, body extent -2.7,-1.8 2.7,1.8, height 2.3
SOD-123 [mm]
  rect 0.95x0.9 smd: 1(-1.575,0) 2(1.575,0)
  silkscreen extent -1.37,-0.8 2.82,0.8, body extent -1.82,-0.77 1.83,0.78, height 1.5
SOD-323 [mm]
  rect 0.8x0.9 smd mask+0.055: 1(-1.15,0) 2(1.15,0)
  silkscreen extent -2.01,-0.79 0.94,0.79, body extent -1.3,-0.67 1.3,0.67, height 1.1
SOD-523F [mm]
  rect 0.8x0.52 smd: 1(-1,0) 2(1,0)
  silkscreen extent -0.64,-0.51 1.78,0.51, body extent -0.8,-0.4 0.8,0.4, height 0.7
SOIC-8 [mm]
  rect 1.55x0.6 smd: 1(-2.7,1.905) 2(-2.7,0.635) 3(-2.7,-0.635) 4(-2.7,-1.905) 5(2.7,-1.905) 6(2.7,-0.635) 7(2.7,0.635) 8(2.7,1.905)
  silkscreen extent -3.76,-2.49 1.99,2.49, body extent -3,-2.45 3,2.45, height 1.7
SOIC-16 [mm]
  rect 1.95x0.55 smd: 1(-2.41,4.445) 2(-2.41,3.175) 3(-2.41,1.905) 4(-2.41,0.635) 5(-2.41,-0.635) 6(-2.41,-1.905) 7(-2.41,-3.175) 8(-2.41,-4.445) 9(2.41,-4.445) 10(2.41,-3.175) 11(2.41,-1.905) 12(2.41,-0.635) 13(2.41,0.635) 14(2.41,1.905) 15(2.41,3.175) 16(2.41,4.445)
  silkscreen extent -3.71,-5 1.96,5, body extent -3,-4.95 3,4.95, height 1.75
"Solder Bridge" [mil] "Solder Bridge ON"
  rect 30x35 smd: 1(-30,0) 2(30,0)
  silkscreen extent -50,-22 50,22
SOP-4_1.27 [mm]
  rect 1.3x0.9 smd: 1(-3.15,0.635) 2(-3.15,-0.635) 3(3.15,-0.635) 4(3.15,0.635)
  silkscreen extent -4.09,-1.45 2.04,1.45, body extent -3.5,-1.4 3.5,1.4, height 2.1
SOP-8 [mm]
  rect 1.3x0.7 smd: 1(-2.75,1.905) 2(-2.75,0.635) 3(-2.75,-0.635) 4(-2.75,-1.905) 5(2.75,-1.905) 6(2.75,-0.635) 7(2.75,0.635) 8(2.75,1.905)
  silkscreen extent -3.69,-2.57 2.03,2.57, body extent -3.1,-2.5 3.1,2.5, height 1.76
SOP-16_150mil [mm]
  rect 1.1x0.6 smd: 1(-2.875,4.445) 2(-2.875,3.175) 3(-2.875,1.905) 4(-2.875,0.635) 5(-2.875,-0.635) 6(-2.875,-1.905) 7(-2.875,-3.175) 8(-2.875,-4.445) 9(2.875,-4.445) 10(2.875,-3.175) 11(2.875,-1.905) 12(2.875,-0.635) 13(2.875,0.635) 14(2.875,1.905) 15(2.875,3.175) 16(2.875,4.445)
  silkscreen extent -3.71,-5.03 1.91,5.03, body extent -3.04,-5 3.04,5, height 1.62
Sot-23 [mm] "TRANS NPN 40V 0.6A SOT23"
  rect 0.82x0.92 smd: 1(-0.95,-1) 2(0.95,-1) 3(0,1)
  silkscreen extent -1.68,-1.3 1.55,0.81, body extent -1.5,-1.25 1.5,1.25, height 1.05
SOT-23 [mm] "TRANS NPN 40V 0.6A SOT23"
  rect 0.82x0.92 smd: 1(-0.95,-1) 2(0.95,-1) 3(0,1)
  silkscreen extent -1.68,-1.3 1.55,0.81, body extent -1.5,-1.25 1.5,1.25, height 1.05
SOT-23-5 [mm]
  rect 1.1x0.6 smd: 1(-1.3,0.95) 2(-1.3,0) 3(-1.3,-0.95) 4(1.3,-0.95) 5(1.3,0.95)
  silkscreen extent -2.13,-1.5 0.88,1.5, body extent -1.4,-1.45 1.4,1.45, height 1.45
SOT-363 [mm]
  rect 0.8x0.4 smd: 1(-0.97,0.65) 2(-0.97,0) 3(-0.97,-0.65) 4(0.97,-0.65) 5(0.97,0) 6(0.97,0.65)
  silkscreen extent -1.65,-1.09 0.51,1.09, body extent -1.15,-1.05 1.15,1.05, height 1
SOT-583 [mm]
  rect 0.67x0.3 smd: 1(-0.74,0.75) 2(-0.74,0.25) 3(-0.74,-0.25) 4(-0.74,-0.75) 5(0.74,-0.75) 6(0.74,-0.25) 7(0.74,0.25) 8(0.74,0.75)
  silkscreen extent -1.35,-1.07 0.56,1.07, body extent -0.8,-1.05 0.8,1.05, height 0.6
SOT-723 [mm]
  rect 0.5x0.45 smd: 1(-0.4,-0.575) 2(0.4,-0.575) 3(0,0.575)
  silkscreen extent -0.94,-0.66 0.64,0.64, body extent -0.6,-0.6 0.6,0.6, height 0.5
SSOP-20-5.2mm [mm]
  rect 1.25x0.42 smd: 1(-2.85,2.925) 2(-2.85,2.275) 3(-2.85,1.625) 4(-2.85,0.975) 5(-2.85,0.325) 6(-2.85,-0.325) 7(-2.85,-0.975) 8(-2.85,-1.625) 9(-2.85,-2.275) 10(-2.85,-2.925) 11(2.85,-2.925) 12(2.85,-2.275) 13(2.85,-1.625) 14(2.85,-0.975) 15(2.85,-0.325) 16(2.85,0.325) 17(2.85,0.975) 18(2.85,1.625) 19(2.85,2.275) 20(2.85,2.925)
  silkscreen extent -3.78,-3.3 2.06,3.28, body extent -3.2,-3.27 3.22,3.23, height 1.3
SSOP-28-208mil [mm]
  rect 1.25x0.42 smd: 1(-3.4,4.225) 2(-3.4,3.575) 3(-3.4,2.925) 4(-3.4,2.275) 5(-3.4,1.625) 6(-3.4,0.975) 7(-3.4,0.325) 8(-3.4,-0.325) 9(-3.4,-0.975) 10(-3.4,-1.625) 11(-3.4,-2.275) 12(-3.4,-2.925) 13(-3.4,-3.575) 14(-3.4,-4.225) 15(3.4,-4.225) 16(3.4,-3.575) 17(3.4,-2.925) 18(3.4,-2.275) 19(3.4,-1.625) 20(3.4,-0.975) 21(3.4,-0.325) 22(3.4,0.325) 23(3.4,0.975) 24(3.4,1.625) 25(3.4,2.275) 26(3.4,2.925) 27(3.4,3.575) 28(3.4,4.225)
  silkscreen extent -4.34,-5.21 2.72,5.21, body extent -3.88,-5.17 3.88,5.17, height 2.15
Test-point [mil]
  oct 60x60 smd: 1(0,0)
  silkscreen extent -37,-37 37,37
TO263-3_ [mil]
  rect 64x170 smd: 1(-100,-180)
  rect 60x170 smd: 2(0,-180) 3(100,-180)
  rect 440x390 smd: 4(0,180)
  silkscreen extent -205,-172 204,382, body extent -203,-215 203,380, height 181
"TO-263-5 (D2PAK)" [mm]
  rect 1.02x4.32 smd: 1(-3.4,-4.573) 2(-1.7,-4.573) 3(0,-4.573) 4(1.7,-4.573) 5(3.4,-4.573)
  rect 11.18x9.91 smd: 6(0,4.573)
  silkscreen extent -5.16,-4.72 5.16,-0.61, body extent -5.11,-5.78 5.05,9.13, height 4.83
TO-277 [mm]
  rect 1.3x1.3 smd: 1(-0.93,-1.975) 3(0.93,-1.975)
  rect 3.4x4.6 smd: 2(0,1.975)
  silkscreen extent -2.16,-2.59 2.16,3.73, body extent -2.1,-2.39 2.1,4.06, height 1.2
U.FL-R-SMT-1(80)_ [mm]
  rect 1.02x1.07 smd: 1(0,-0.974)
  rect 1.07x2.2 smd: 2(1.475,0.974) 3(-1.475,0.974)
  silkscreen extent -1.22,-1.09 1.22,2.21, body extent -1.47,-0.74 1.53,2.36, height 1.2
UCD-220uF-10mmDia [mm] "0.406\" L x 0.406\" W (10.30mm x 10.30mm)"
  rect 4x2.5 smd: 1(-4,0) 2(4,0)
  silkscreen extent -5.95,-5.21 5.13,5.21, body extent -5.45,-5.15 5.45,5.15, height 10.8
"Voltlink Target" [mm]
  rect 0.5x1.6 smd: 1(-2.5,-1.262) 2(-1.5,-1.262) 3(-0.5,-1.262) 4(0.5,-1.262) 5(1.5,-1.262) 6(2.5,-1.262)
  rect 1.2x1.8 smd: MP1(-3.8,1.262) MP2(3.8,1.262)
  silkscreen extent -4.06,-1.68 4.06,2.17, body extent -4,-1.49 4,2.11, height 4.25
VSSOP-8(2x2.3x0.5) [mm]
  rect 0.8x0.3 smd: 1(-1.55,0.75) 2(-1.55,0.25) 3(-1.55,-0.25) 4(-1.55,-0.75) 5(1.55,-0.75) 6(1.55,-0.25) 7(1.55,0.25) 8(1.55,0.75)
  silkscreen extent -2.24,-1.04 1.07,1.04, body extent -1.55,-1 1.55,1, height 0.88
WS2812B-B/W [mm]
  rect 1.5x1 smd: 1(-2.5,1.65) 2(-2.5,-1.65) 3(2.5,-1.65) 4(2.5,1.65)
  silkscreen extent -3.56,-2.55 2.5,2.55, body extent -2.7,-2.5 2.7,2.5, height 1.55
X49SD3579545MSD2SC-1 [mm]
  rect 1.8x1.8 hole 0.9: 1(-2.44,0)
  round 1.8 hole 0.9: 2(2.44,0)
  silkscreen extent -5.74,-2.44 5.66,2.31, body extent -5.7,-2.39 5.65,2.26, height 4
XKNANO-113 [mm]
  rect 0.7x2.1 smd: 1(-6.5,5.26) 2(6.5,5.26) 3(6.5,-6.74) 4(-6.5,-6.74)
  rect 0.8x1.14 smd: C1(0.25,6.74) C2(-2.29,6.74) C3(-4.83,6.74) C5(1.52,6.74) C6(-1.02,6.74) C7(-3.56,6.74) CD(2.47,6.74)
  rect 0x0 hole 0.75 unplated: MH(-5,-5.49) MH(3.5,-5.49)
  Keep-Out Layer region: -4.366,-2.701 -2.995,-2.701 -2.995,-6.029 -4.366,-6.029
  Keep-Out Layer region: -1.826,-2.701 -0.455,-2.701 -0.455,-6.029 -1.826,-6.029
  Keep-Out Layer region: 0.714,-2.701 2.085,-2.701 2.085,-6.029 0.714,-6.029
  silkscreen extent -6.6,-7.95 6.58,7.06, body extent -6.55,-7.57 6.54,7.01, height 1.37

## Part data
ANT1: "Standard GNSS Antenna Linear 50Ohm 1602MHz Surface Mount", Manufacturer="TE Connectivity", Max Power Dissipation=3W, Category="RF Antennas", ComponentLink1Description=https://www.te.com/commerce/DocumentDelivery/DDEController?Action=srchrtrv&amp;DocNm=1-1773969-5-GNSS-2118900-1-ant-datasheet&amp;DocType=DS&amp;DocLang=English&src-supplier=Digi-Key, ComponentLink1URL=https://www.te.com/commerce/DocumentDelivery/DDEController?Action=srchrtrv&amp;DocNm=1-1773969-5-GNSS-2118900-1-ant-datasheet&amp;DocType=DS&amp;DocLang=English&src-supplier=Digi-Key, Item Type=Antenna, Manufacturer Part Number=2118900-1, Mounting Technology="Surface Mount", Number of Bands=1, Pricing 1="1=0.6707, 10=0.6495, 25=0.6314, 100=0.5857, 250=0.5691 (USD)", RoHS=Yes, RoHS Compliant=Yes, Series=-, Stock 1=449, Supplier 1="Arrow Electronics", Supplier Part Number 1=2118900-1, VSWR=2
C1 C9 C12 C13 C15 C17 C21 C22 C23 C24 C25 C26 C29 C38 C42 C43 C44 C45 C46 C47 C50 C51 C54 C57 C58 C59 C60 C61 C62 C64 C65 C66 C67 C68 C69 C70 C72 C73: library part CC0603KRX5R9BB104, "CAP CER 0.1UF 50V X5R 0603", Capacitance=100nF, Case Code (Imperial)=0603, Case Code (Metric)=1608, Dielectric=X5R, LCSC Part Number=C110022, Manufacturer=Yageo, Max Operating Temperature=85°C, Min Operating Temperature=-55°C, Package Quantity=4000, Supplier Part Number 1=311-4046-1-ND, Tolerance=10%, Voltage Rating=50V, Case/Package=0603, Category="Ceramic Capacitors", ComponentLink1Description=http://www.mouser.com/ds/2/447/Yageo_UPY-GP_NP0_16V-to-50V_9-358835.pdf?src-supplier=Mouser, ComponentLink1URL=http://www.mouser.com/ds/2/447/Yageo_UPY-GP_NP0_16V-to-50V_9-358835.pdf?src-supplier=Mouser, ComponentLink2Description=https://www.yageo.com/upload/media/product/productsearch/datasheet/mlcc/UPY-GPHC_X5R_4V-to-50V_26.pdf?src-supplier=Digi-Key, ComponentLink2URL=https://www.yageo.com/upload/media/product/productsearch/datasheet/mlcc/UPY-GPHC_X5R_4V-to-50V_26.pdf?src-supplier=Digi-Key, ComponentLink3Description=http://www.yageo.com/exep/pages/download/literatures/ProductSelectionGuide%202014_Final_2.pdf?src-supplier=Digi-Key, ComponentLink3URL=http://www.yageo.com/exep/pages/download/literatures/ProductSelectionGuide%202014_Final_2.pdf?src-supplier=Digi-Key, Halogen Free="Halogen Free", Item Type=Capacitor, Lead Free="Lead Free", Length=0.063inch, Manufacturer Part Number=CC0603KRX5R9BB104, Mount="Surface Mount", Packaging="Tape and Reel", Pricing 1="1=0.10000, 10=0.05200, 50=0.02820, 100=0.02310, 500=0.01648, 1000=0.01294 (USD)", RoHS=Yes, Stock 1=152253, Supplier 1=Digi-Key, Termination=SMD/SMT, Thickness=0.035inch, Voltage Rating (DC)=50V, Weight=7.1E-05oz, Width=0.031inch
C2: library part GVT1C331M0607, "330uF 16V ±20% SMD,D6.3xL7.7mm Aluminum Electrolytic Capacitors - SMD ROHS", LCSC Part Number=C2980164, Manufacturer="Honor Elec", Package=SMD,D6.3xL7.7mm, ComponentLink1Description=LCSC, ComponentLink1URL=https://www.lcsc.com/product-detail/Aluminum-Electrolytic-Capacitors-SMD_Honor-Elec-GVT1C331M0607_C2980164.html, Item Type=Capacitor, Manufacturer Part Number=GVT1C331M0607
C3 C33 C34: library part AC0603KRX7R0BB103, "CAP CER 10000PF 100V X7R 0603", Case Code (Imperial)=0603, Case Code (Metric)=1608, LCSC Part Number=C149602, Manufacturer=Yageo, Max Operating Temperature=125°C, Min Operating Temperature=-55°C, Ratings=AEC-Q200, Supplier Part Number 1=1985307, Tolerance=10%, Voltage Rating=100V, Capacitance=10nF, Case/Package=0603, Category="Ceramic Capacitors", ComponentLink1Description=http://www.yageo.com/NewPortal/_en/search/productDocs.jsp?YageoPartNumber=AC0603KRX7R0BB103&src-supplier=Digi-Key, ComponentLink1URL=http://www.yageo.com/NewPortal/_en/search/productDocs.jsp?YageoPartNumber=AC0603KRX7R0BB103&src-supplier=Digi-Key, ComponentLink2Description=https://www.yageo.com/upload/media/product/productsearch/datasheet/mlcc/UPY-AC_NP0X7R_16V-to-630V_12.pdf?src-supplier=Digi-Key, ComponentLink2URL=https://www.yageo.com/upload/media/product/productsearch/datasheet/mlcc/UPY-AC_NP0X7R_16V-to-630V_12.pdf?src-supplier=Digi-Key, Item Type=Capacitor, Lead Free="Lead Free", Manufacturer Part Number=AC0603KRX7R0BB103, Mount="Surface Mount", Packaging="Tape and Reel", Pricing 1="250=0.02700, 1000=0.02500, 2000=0.02100 (GBP)", RoHS=Yes, RoHS Compliant=Yes, Stock 1=750, Supplier 1=RSComponents
C4: library part TAJB107M010RNJ, "CAP TANT 100UF 20% 10V 1411", Case Code (Imperial)=1210, Case Code (Metric)=3528, Dielectric Material=Tantalum, ESR (Equivalent Series Resistance)=1.4R, LCSC Part Number=C7196, Leakage Current=10uA, Manufacturer="Kyocera AVX", Max Operating Temperature=125°C, Min Operating Temperature=-55°C, Package Quantity=2000, Supplier Part Number 1=1354069, Tolerance=10%, Voltage=10V, Case/Package=1210, Category="Tantalum Capacitors", ComponentLink1Description=https://datasheet.ciiva.com/264/taj-264281.pdf?src-supplier=Digi-Key, ComponentLink1URL=https://datasheet.ciiva.com/264/taj-264281.pdf?src-supplier=Digi-Key, ComponentLink2Description=https://datasheet.ciiva.com/264/taj-264280.pdf?src-supplier=Digi-Key, ComponentLink2URL=https://datasheet.ciiva.com/264/taj-264280.pdf?src-supplier=Digi-Key, ComponentLink3Description=https://datasheet.ciiva.com/264/taj-264282.pdf?src-supplier=Digi-Key, ComponentLink3URL=https://datasheet.ciiva.com/264/taj-264282.pdf?src-supplier=Digi-Key, ComponentLink4Description=https://datasheet.ciiva.com/11225/taj-11225964.pdf?src-supplier=Avnet, ComponentLink4URL=https://datasheet.ciiva.com/11225/taj-11225964.pdf?src-supplier=Avnet, ComponentLink5Description=https://datasheet.ciiva.com/11225/taj-11225963.pdf?src-supplier=Avnet, ComponentLink5URL=https://datasheet.ciiva.com/11225/taj-11225963.pdf?src-supplier=Avnet, Construction=Flat, Depth=2.8mm, Dissipation Factor=8%, Features="General Purpose", Height=2.1mm, Item Type=Capacitor, Lead Free="Lead Free", Length=3.5mm, Manufacturer Part Number=TAJB107M010RNJ, Mounting Technology="Surface Mount", Packaging="Tape and Reel", Pricing 1="2000=0.302 (GBP)", Radiation Hardening=No, Reach SVHC Compliant=No, RoHS=Yes, RoHS Compliant=Yes, Series=TAJ, Stock 1=17520, Supplier 1=Rs, Termination=SMD/SMT, Voltage Rating=10V, Voltage Rating (DC)=10V, Width=2.8mm
C5 C7 C8: library part RVT1H680M0607, "68uF 50V SMD,D6.3xL7.7mm Aluminum Electrolytic Capacitors - SMD ROHS", LCSC Part Number=C5221836, Manufacturer=ROQANG, Package=SMD,D6.3xL7.7mm, ComponentLink1Description=LCSC, ComponentLink1URL=https://www.lcsc.com/product-detail/Aluminum-Electrolytic-Capacitors-SMD_ROQANG-RVT1H680M0607_C5221836.html, Item Type=Capacitor, Manufacturer Part Number=RVT1H680M0607
C6 C14 C16 C18 C40: library part CC0603KRX5R8BB105, "CAP CER 1UF 25V X5R 0603", Case Code (Imperial)=0603, Case Code (Metric)=1608, Dielectric=X5R, LCSC Part Number=C14664, Manufacturer=Yageo, Max Operating Temperature=85°C, Min Operating Temperature=-55°C, Package Quantity=1, Supplier Part Number 1=311-1445-1-ND, Tolerance=10%, Voltage Rating=25V, Capacitance=1uF, Case/Package=0603, Category="Ceramic Capacitors", ComponentLink1Description=https://datasheet.ciiva.com/176/mlccorderingcode-176785.pdf?src-supplier=Digi-Key, ComponentLink1URL=https://datasheet.ciiva.com/176/mlccorderingcode-176785.pdf?src-supplier=Digi-Key, ComponentLink2Description=https://datasheet.ciiva.com/176/mlccorderingcode-176786.pdf?src-supplier=Digi-Key, ComponentLink2URL=https://datasheet.ciiva.com/176/mlccorderingcode-176786.pdf?src-supplier=Digi-Key, ComponentLink3Description=https://datasheet.ciiva.com/176/mlccorderingcode-176787.pdf?src-supplier=Digi-Key, ComponentLink3URL=https://datasheet.ciiva.com/176/mlccorderingcode-176787.pdf?src-supplier=Digi-Key, ComponentLink4Description=https://datasheet.ciiva.com/17436/upy-gphc-x5r-4v-to-50v-12-17436952.pdf?src-supplier=Avnet+Europe, ComponentLink4URL=https://datasheet.ciiva.com/17436/upy-gphc-x5r-4v-to-50v-12-17436952.pdf?src-supplier=Avnet+Europe, ComponentLink5Description=https://datasheet.ciiva.com/7978/1525783-7978171.pdf?src-supplier=Element14, ComponentLink5URL=https://datasheet.ciiva.com/7978/1525783-7978171.pdf?src-supplier=Element14, ComponentLink6Description=https://datasheet.ciiva.com/11586/upy-gphc-x5r-4v-to-50v-12-11586318.pdf?src-supplier=Avnet, ComponentLink6URL=https://datasheet.ciiva.com/11586/upy-gphc-x5r-4v-to-50v-12-11586318.pdf?src-supplier=Avnet, Construction=Flat, Depth=0.8mm, Halogen Free="Halogen Free", Height=0.8mm, Lead Free="Lead Free", Length=1.6mm, Manufacturer Part Number=CC0603KRX5R8BB105, Mount="Surface Mount", Number of Pins=2, Packaging="Tape and Reel", Pricing 1="1=0.12000, 10=0.08400, 50=0.04760, 100=0.03940, 500=0.02764, 1000=0.02288 (USD)", Radiation Hardening=No, REACH SVHC="No SVHC", RoHS=Yes, RoHS Compliant=Yes, Series=CC, Stock 1=919939, Supplier 1=Digi-Key, Termination=SMD/SMT, Thickness=0.035inch, Voltage Rating (DC)=25V, Width=0.031inch
C10: library part CA45-A-6.3V-47uF-K, "47uF 6.3V 5Ω@100kHz ±10% CASE-A-3216 Tantalum Capacitors ROHS", LCSC Part Number=C129570, Manufacturer=CEC, Package=CASE-A-3216, ComponentLink1Description=LCSC, ComponentLink1URL=https://www.lcsc.com/product-detail/Tantalum-Capacitors_CEC-Shenzhen-Zhenhua-XinYun-Elec-CA45-A-6-3V-47uF-K_C129570.html, Item Type=Capacitor, Manufacturer Part Number=CA45-A-6.3V-47uF-K
C11: library part RVT1E100M0405, "CAP ALUM 10uF 25V SMD", LCSC Part Number=C970655, Manufacturer=ROQANG, Operating Temperature=-45℃~+105℃, Rated Voltage=25V, Tolerance=±20%, Capacitance=10uF, ComponentLink1Description=LCSC, ComponentLink1URL=https://www.lcsc.com/product-detail/Aluminum-Electrolytic-Capacitors-SMD_10uF-25V-20_C72484.html, Item Type=Capacitor, L=5.4mm, Manufacturer Part Number=RVT1E100M0405, φD=4mm
C19 C20: library part CC0603MRX5R6BB226, "CAP CER 22UF 10V X5R 0603", Case Code (Imperial)=0603, Case Code (Metric)=1608, Dielectric=X5R, LCSC Part Number=C109447, Manufacturer=Yageo, Max Operating Temperature=85°C, Min Operating Temperature=-55°C, Package Quantity=4000, Supplier Part Number 1=311-1819-1-ND, Tolerance=20%, Voltage Rating=10V, Capacitance=22uF, Case/Package=0603, Category="Ceramic Capacitors", ComponentLink1Description=http://www.mouser.com/ds/2/447/Yageo_UPY-GP_NP0_16V-to-50V_9-358835.pdf?src-supplier=Mouser, ComponentLink1URL=http://www.mouser.com/ds/2/447/Yageo_UPY-GP_NP0_16V-to-50V_9-358835.pdf?src-supplier=Mouser, ComponentLink2Description=http://www.yageo.com/documents/recent/UPY-GPHC_X5R_4V-to-50V_25.pdf?src-supplier=Digi-Key, ComponentLink2URL=http://www.yageo.com/documents/recent/UPY-GPHC_X5R_4V-to-50V_25.pdf?src-supplier=Digi-Key, Halogen Free="Halogen Free", Height=0.8mm, Item Type=Capacitor, Lead Free="Lead Free", Length=0.063inch, Manufacturer Part Number=CC0603MRX5R6BB226, Mount="Surface Mount", Packaging="Tape and Reel", Pricing 1="1=0.68000, 10=0.48000, 50=0.36300, 100=0.31610, 500=0.23416, 1000=0.19903 (USD)", RoHS=Yes, RoHS Compliant=Yes, Stock 1=19628, Supplier 1=Digi-Key, Termination=SMD/SMT, Thickness=0.035inch, Voltage Rating (DC)=10V, Weight=7.1E-05oz, Width=0.8mm
C27 C28 C71: library part C1608X5R1E106M080AC, "CAP CER 10UF 25V X5R 0603", Case Code (Imperial)=0603, Case Code (Metric)=1608, Dielectric=X5R, Dielectric Material=Ceramic, LCSC Part Number=C2168289, Manufacturer=TDK, Max Operating Temperature=85°C, Min Operating Temperature=-55°C, Package Quantity=1, Supplier Part Number 1=445-9015-1-ND, Tolerance=20%, Voltage Rating=25V, Capacitance=10uF, Case/Package=0603, Composition=Ceramic, Depth=0.8mm, Height=0.8mm, Lead Free="Lead Free", Length=1.6mm, Manufacturer Part Number=C1608X5R1E106M080AC, Mount="Surface Mount", Packaging="Tape and Reel", Pricing 1="1=0.96, 10=0.704, 100=0.483, 500=0.38238, 1000=0.322 (USD)", REACH SVHC="No SVHC", Stock 1=61681, Supplier 1=Digi-Key, Termination=SMD/SMT, Thickness=0.039inch, Voltage Rating (DC)=25V, Weight=7.1E-05oz, Width=0.8mm
C30 C31: library part 0603B682K500NT, "50V 6.8nF X7R ±10% 0603", LCSC Part Number=C1631, Manufacturer=FH, ComponentLink1Description=LCSC, ComponentLink1URL=https://www.lcsc.com/product-detail/Multilayer-Ceramic-Capacitors-MLCC-SMD-SMT_FH-Guangdong-Fenghua-Advanced-Tech-0603B682K500NT_C1631.html, Item Type=Capacitor, Manufacturer Part Number=0603B682K500NT